# Altium PCB Fast_Servo.PCBDOC (part 10 of 11)
Units mm, origin at the board's own origin, x right, y up, seen from the top; angles counter-clockwise.
Board outline 162.48 x 100 mm, 6 copper layers (Top, GP1(GND), L3, L4, P3V3, Bot), stack 1.716 mm thick; 668 components, 491 nets, 2308 pads, 1133 vias.
Unrouted connection lines stored in the file: 2.
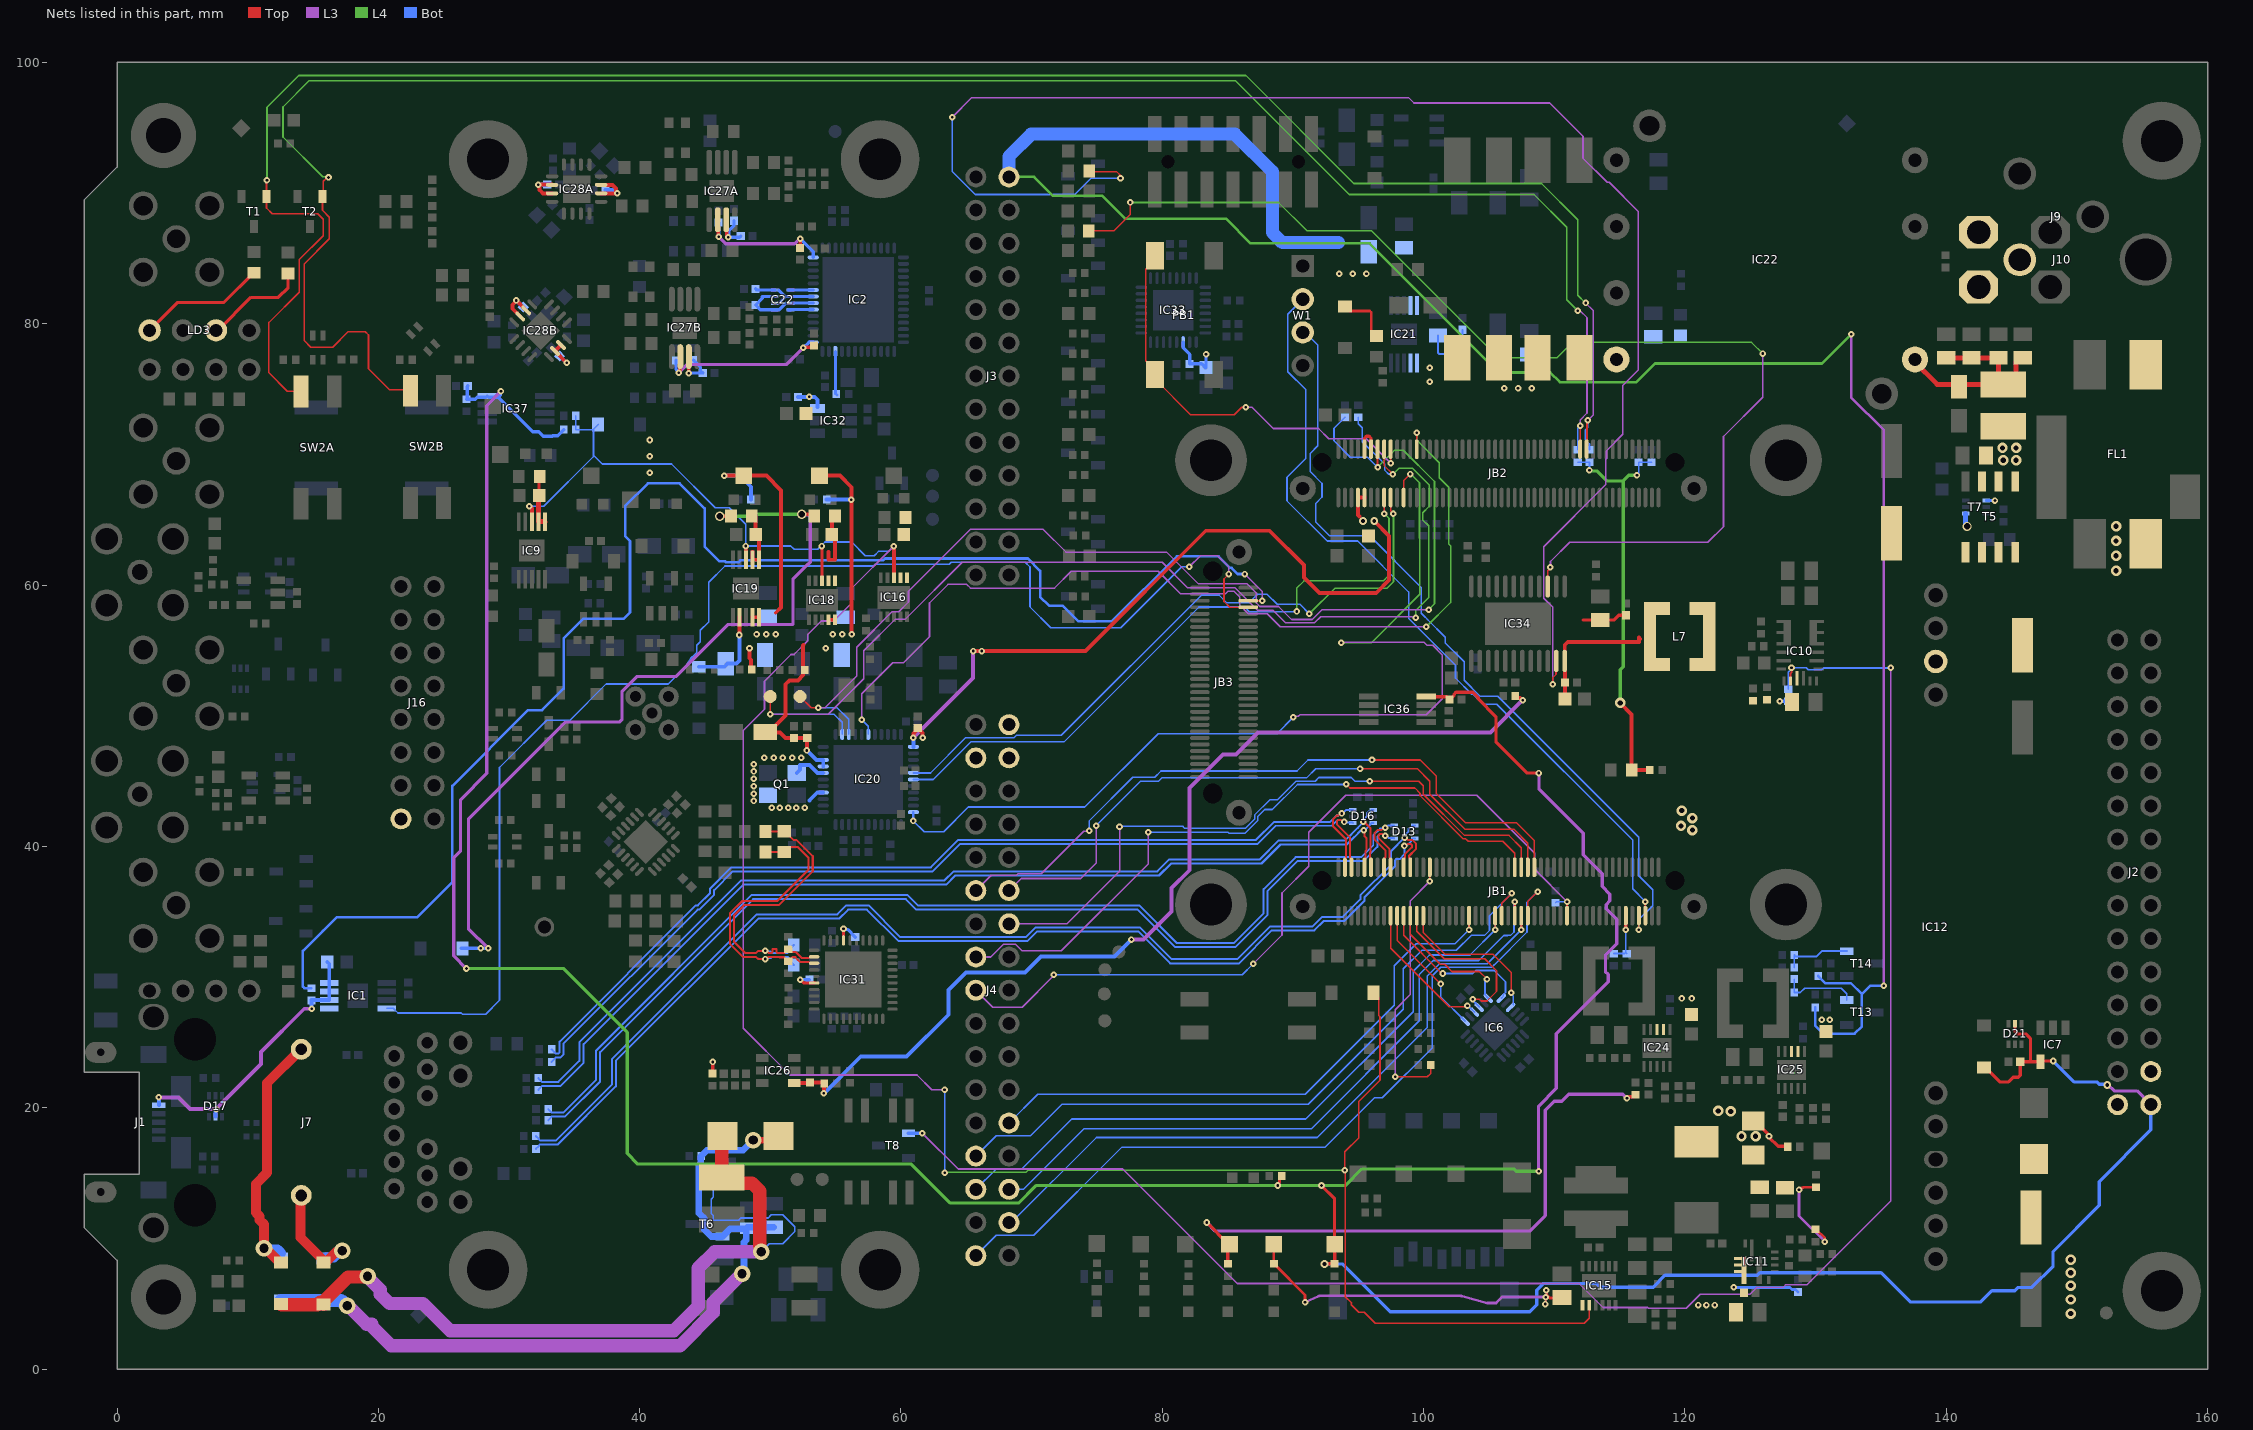
[diagram p12: the nets of this part, all layers, seen from the top]

## Via types
v1: diameter 0.5, hole 0.2, Top to Bot, tented both sides, 1045 vias
v2: diameter 0.8, hole 0.4, Top to Bot, tented both sides, 40 vias
v3: diameter 0.6, hole 0.3, Top to Bot, tented both sides, 27 vias
v4: diameter 1.27, hole 0.711, Top to Bot, tented both sides, 11 vias
v5: diameter 0.7, hole 0.5, Top to Bot, tented both sides, 10 vias

## Nets (pads, with @x,y where several pads share a name; then routed paths per layer and width w, separated by ;. In a path a pad name is that pad's centre, name@x,y a point inside that pad or via, vN(x,y) a via of type N, cw(c..) or ccw(c..) an arc to the next point about the centre after c; other vN are vias at no path point) (continued)
P3V3_LDO_1: C133.2 IC16.1 IC16.2 L21.2
P3V3_LDO_2: C197.2 IC9.1 IC9.2 L22.2 | length 4.1
  Top w0.25: C197.2@32.303,66.849 32.303,67.929 32.132,68.099 L22.2@32.353,68.32
  Top w0.381: C197.2@32.303,66.849 32.274,66.82 32.274,64.877 32.286,64.866 32.728,64.866 IC9.1@32.745,64.849
P3V3_MP: C98.2 C204.2 C205.2 D21.5 D26.1 IC7.4 IC36.8 IC37.8 J2.30 R110.1 R133.1 R226.1 R231.1 TP17.1 | length 306
  Top w0.254: v1(88.824,14.05) 88.824,14.117 88.966,14.259 88.966,14.62 R133.1@89.129,14.783 ; v1(92.184,14.05) 93.185,13.049 TP17.1@93.185,9.565 93.189,9.561 93.189,8.114 R110.1@93.15,8.075 ; v3(92.425,8.05) 92.5,8.05 92.512,8.062 R110.1@93.189,8.062 ; IC36.8@100.216,51.465 101.766,51.465 C204.2@101.991,51.24 102.329,51.578 102.329,51.655 102.477,51.802 103.306,51.802 103.315,51.793 103.754,51.793 104.176,51.371 104.176,51.305 105.537,49.944 105.537,48 107.92,45.617 v1(108.825,45.617) ; D26.1@142.9,23.1 142.98,23.1 144.101,21.979 144.765,21.979 145.127,22.342 145.516,22.342 145.665,22.49 C98.2@145.665,23.525 146.445,23.525 ; D21.5@145.265,26.441 145.265,25.801 145.415,25.651 146.099,25.651 146.445,25.305 146.445,23.525 ; v1(148.175,23.578) 146.978,23.578 146.925,23.525 146.445,23.525
  L3 w0.254: v1(26.746,30.658) 25.762,31.642 25.762,39.14 26.29,39.668 26.29,43.591 28.288,45.589 28.288,73.732 v1(29.387,74.831) ; v1(108.799,15.133) 108.799,20.127 110.16,21.487 110.16,25.672 114.122,29.634 114.122,30.201 113.919,30.404 113.919,31.674 114.781,32.535 114.781,34.416 113.975,35.221 113.975,35.554 114.25,35.829 114.25,36.357 113.668,36.939 113.668,37.927 112.225,39.369 112.225,41.015 108.825,44.415 v1(108.825,45.617) ; v3(152.32,21.732) 152.4,21.732 152.841,21.29 154.602,21.29 J2.30@155.654,20.238
  L4 w0.254: v1(26.746,30.658) 26.752,30.664 34.157,30.664 39.059,25.761 39.059,16.501 39.865,15.695 60.801,15.695 63.788,12.708 68.994,12.708 70.333,14.046 94.012,14.046 95.282,15.316 106.909,15.316 107.092,15.133 v1(108.799,15.133) ; v3@92.42,8.062 v3@92.437,8.062
  Bot w0.25: 151.7,14.35 155.654,18.304 J2.30@155.654,20.238
  Bot w0.254: C205.2@26.845,75.252 26.797,75.204 26.797,74.283 R231.1@26.75,74.236 27.415,74.236 27.555,74.376 28.237,74.376 IC37.8@28.335,74.474 28.433,74.376 29.191,74.376 ; v1(29.387,74.831) 29.34,74.784 29.34,74.524 29.191,74.376 ; R226.1@34.18,71.899 34.18,71.879 34.017,71.716 33.997,71.716 33.724,71.443 33.353,71.443 33.315,71.405 32.615,71.405 32.27,71.75 31.817,71.75 29.191,74.376 ; v3(92.425,8.05) 93.78,8.05 97.45,4.38 108.115,4.38 108.665,4.93 108.665,6.048 109.164,6.547 113.234,6.547 113.506,6.276 117.576,6.276 118.472,7.172 125.533,7.172 125.743,7.382 135.006,7.382 137.25,5.138 142.638,5.138 143.5,6 145.25,6 145.5,6.25 146.558,6.25 148.175,7.867 148.175,9 151.7,12.525 151.7,14.35 ; v1(148.175,23.578) 149.775,21.978 151.512,21.978 151.692,21.798 152.254,21.798 v3(152.32,21.732)
P3V3_POWER_OK: IC10.14 R136.2 T8.1 | length 135.4
  Top w0.125: IC10.14@128.075,52.672 128.075,53.235 128.154,53.313 128.154,53.675 v1(128.156,53.678)
  L3 w0.125: v1(61.639,18.049) 64.376,15.313 76.974,15.313 85.734,6.553 111.895,6.553 113.735,4.713 117.165,4.713 117.218,4.661 120.111,4.661 121.18,5.73 124.98,5.73 125.5,6.25 127.5,6.25 127.692,6.442 129.324,6.442 135.75,12.869 v1(135.75,53.678)
  Bot w0.125: R136.2@127.907,52.042 127.907,53.327 128.156,53.576 v1(128.156,53.678) 129.288,53.678 129.445,53.521 130.475,53.521 130.614,53.66 135.732,53.66 v1(135.75,53.678)
  Bot w0.3: T8.1@60.576,18.051 61.637,18.051 v1(61.639,18.049)
P3V3_SOM_OUT: JB2.9 JB2.11 | length 2.3
  Top w0.25: JB2.9@95.475,70.404 95.475,71.25 95.621,71.396 95.828,71.396 95.965,71.26 95.965,70.413 JB2.11@95.975,70.404
P3V3A: C7.2 C8.2 C48A.2 C48B.2 C49A.2 C49B.2 C86.2 C87.2 C142.2 C143.1 C156.2 C157.2 C162.1 IC18.9 IC18.10 IC20.8 IC20.9 IC27A.3 IC27B.3 IC31.17 IC31.26 IC33.3 R21.1 R112.1 R216.2 TP4.1 | length 47.5
  Top w0.25: IC18.9@54.457,57.343 IC18.10@54.957,57.343
  Top w0.254: v1(43.744,76.22) 43.753,76.229 43.753,77.478 IC27B.3@43.763,77.487 ; R21.1@45.592,22.637 v1@45.592,23.492 ; IC27A.3@46.624,87.962 46.662,87.924 46.662,86.747 v1(46.783,86.625) ; v1(52.303,29.805) 52.553,29.555 IC31.26@53.351,29.555 IC31.26@53.349,29.557 ; IC31.17@55.601,32.805 v1(55.601,33.695)
  Top w0.3: C162.1@49.611,48.754 49.887,48.754 51.166,50.034 51.166,52.413 51.464,52.711 52.118,52.711 52.515,53.108 52.515,55.399 52.553,55.437 ; C162.1@49.887,48.715 50.74,48.715 51.166,48.289 C156.2@51.8,48.289 ; C156.2@51.8,48.3 C157.2@52.825,48.3 52.814,48.289 52.814,47.357 v1(52.803,47.346) ; TP4.1@53.761,68.38 55.32,68.38 56.207,67.494 v1(56.207,66.539) 56.207,56.281 v1(56.244,56.244)
  Bot w0.25: C48B.2@44.125,77.215 44.125,77.195 44.269,77.051 44.289,77.051 44.658,76.682 44.658,76.42 C49B.2@44.83,76.247 ; C49A.2@47.214,87.891 47.214,87.5 46.831,87.117 46.831,86.673 v1(46.783,86.625) 47.645,86.625 C48A.2@47.737,86.717
  Bot w0.254: v1(43.744,76.22) 43.758,76.233 44.817,76.233 C49B.2@44.83,76.247 ; v1(52.303,29.805) C8.2@53.001,29.805 ; v1(55.601,33.695) 55.649,33.648 55.912,33.648 C7.2@56.5,33.06 ; IC33.3@81.596,78.593 81.598,78.591 81.598,78.155 82.096,77.657 C87.2@82.096,76.934 83.006,76.934 C86.2@83.296,76.644 ; C86.2@83.348,76.644 v1(83.348,77.669)
  Bot w0.3: v1(52.803,47.346) 53.523,46.625 IC20.9@54.05,46.625 IC20.8@54.05,46.125 ; R112.1@54.304,66.539 v1(56.207,66.539)
  other v1: 45.605,23.505 54.232,55.183 54.77,56.244 55.507,56.244
P5V0A: C32.2 C33.2 C38A.2 C38B.2 C52A.2 C52B.2 C146.2 C147.1 IC19.9 IC19.10 IC28A.6 IC28A.7 IC28A.14 IC28A.15 IC28B.6 IC28B.7 IC28B.14 IC28B.15 IC32.3 R108.1 R214.2 TP2.1 | length 35.7
  Top w0.3: IC28B.7@30.864,80.566 30.28,81.149 30.28,81.456 30.555,81.731 v1(30.555,81.785) 30.564,81.785 IC28B.6@31.323,81.025 ; v1(32.225,90.65) 33.289,90.65 IC28A.6@33.302,90.637 IC28A.6@33.096,90.637 ; v1@32.334,90.526 32.334,90.246 32.436,90.144 32.593,89.987 IC28A.7@33.302,89.987 ; IC28B.15@33.975,78.374 IC28B.14@33.515,77.914 v1(34.419,77.01) ; IC28A.14@37.052,89.987 v1(38.287,89.987) ; IC28A.15@37.052,90.637 37.912,90.637 38.202,90.348 v1@38.202,90.094 ; v1(46.465,68.379) TP2.1@47.978,68.38 ; TP2.1@47.978,68.38 49.702,68.38 50.833,67.25 50.833,58.301 50.418,57.886 ; v1(48.407,55.183) 48.407,54.41 48.529,54.287 48.529,53.586 R214.2@48.587,53.527 ; IC19.9@48.632,57.542 IC19.10@49.132,57.542
  Bot w0.3: v1(30.555,81.785) 30.581,81.785 30.645,81.721 31.085,81.282 31.147,81.22 C38B.2@31.164,81.22 ; v1(32.225,90.65) 33.04,90.65 C38A.2@33.052,90.662 ; C52B.2@33.815,77.686 33.815,77.614 v1(34.419,77.01) ; C52A.2@37.371,90.225 37.995,90.225 38.233,89.987 v1(38.287,89.987) ; v1(46.465,68.379) 47.657,68.379 48.508,67.529 R108.1@48.508,66.539 ; C33.2@52.118,74.402 53.403,74.402 53.617,74.188 IC32.3@53.617,73.643
  other v1: 48.945,56.244 49.681,56.244 50.418,56.244 40.774,68.594 40.774,69.85 40.774,71.106 52.975,74.429
P5V5: C105.2 C111.2 C187.2 D30.2 IC10.15 IC24.2 IC24.3 IC25.2 IC25.3 L7.1 L17.1 L20.1 R114.1 R128.2 R129.2 R136.1 R139.2 R200.1 R205.1 TP10.1 | length 113.6
  Top w0.254: v5(46.133,65.274) 46.986,65.274 L17.1@46.987,65.276 ; v5(52.41,65.421) 53.21,65.421 L20.1@53.355,65.276 ; v1(83.4,11.22) 85.055,9.565 TP10.1@85.142,9.565 85.02,9.443 R114.1@85.02,8.062 ; v1(115.561,20.722) 115.672,20.832 116.055,20.832 R200.1@116.218,20.995 ; R139.2@124.921,19.311 R139.2@125.232,19 125.357,19 126.385,17.972 126.385,17.865 v1(126.432,17.818) 126.432,17.756 127.141,17.047 127.824,17.047 R205.1@127.857,17.015
  L3 w0.254: v1(28.4,32.2) 26.898,33.702 26.898,42.099 34.319,49.52 38.445,49.52 38.654,49.729 38.654,51.894 39.76,53 42.776,53 46.764,56.988 51.739,56.988 51.739,60.485 52.861,61.608 52.901,61.608 53.05,61.757 53.05,65.237 52.901,65.386 52.445,65.386 v5(52.41,65.421) ; v1(83.4,11.22) 84.054,10.566 108.114,10.566 109.301,11.754 109.301,19.801 110,20.5 110.57,20.5 111.106,21.036 115.246,21.036 v1(115.561,20.722)
  L4 w0.254: v5(46.133,65.274) 48.394,65.274 48.541,65.421 v5(52.41,65.421)
  Bot w0.254: D30.2@26.338,32.2 v1(28.4,32.2) ; v1(127.25,51.122) 127.27,51.102 R136.1@127.907,51.102
  other v1: 130.475,26.728 131.095,26.728 119.75,28.367 120.518,28.367 27.83,32.2
  other v2: 124.327,17.818 125.407,17.818 123.5,19.725 122.547,19.761 120.575,41.253 119.7,41.575 120.575,42.175 119.75,42.741
P5V5_LDO3: C141.2 IC18.1 IC18.2 L20.2 | length 5
  Top w0.3: 54.462,62.522 54.457,62.517 54.457,61.942 54.957,61.942 54.957,63.638 C141.2@54.707,63.888 ; C141.2@54.462,63.643 C141.2@54.707,63.888 ; L20.2@54.955,65.276 54.707,65.027 C141.2@54.707,63.888
P5V5_LDO5: C145.2 IC19.1 IC19.2 L17.2 | length 5
  Top w0.3: IC19.2@48.637,62.522 48.632,62.517 IC19.2@48.632,61.942 IC19.1@49.132,61.942 49.132,63.638 C145.2@48.881,63.888 ; C145.2@48.637,63.643 C145.2@48.881,63.888 ; L17.2@48.687,65.367 L17.2@48.687,65.421 ; L17.2@48.881,65.367 C145.2@48.881,63.888
P5V5A: C91.2 C92.2 C120.2 C121.2 IC34.24 L7.2 | length 13.8
  Top w0.254: 112.225,57.329 C120.2@113.525,57.329 114.564,57.329 114.933,57.698 C121.2@115.475,57.698
  Top w0.3: C91.2@110.813,51.275 110.806,51.281 110.806,54.198 IC34.24@110.8,54.205 110.8,55.43 111.031,55.661 116.475,55.661 116.475,55.987 116.575,55.887 116.575,55.86
P5V5SW: C118.2 C119.2 L6.2 R139.1 R140.2 R207.2 | length 7.4
  Top w0.203: v1(128.732,13.72) 128.812,13.72 128.962,13.87 129.034,13.87 129.089,13.925 R140.2@130.027,13.925 ; R207.2@130.007,10.695 130.027,10.695 130.707,10.015 v1(130.707,9.755)
  L3 w0.203: v1(128.732,13.72) 128.732,11.73 v1(130.707,9.755)
P12V0: C81.1 C104.2 C116.2 C117.2 C176.2 D23.1 FL1.2 IC11.8 IC15.1 J2.28 J2.29 J4.31 J4.32 J4.33 L12.1 R107.2 R138.2 T5.1 T5.2 T5.3 T7.1 TP1.1 | length 32.7
  Top w0.125: v1(109.322,4.978) 109.334,4.991 109.334,5.499 v1(109.347,5.512)
  Top w0.203: TP1.1@88.529,9.565 88.529,8.064 90.925,5.668 v1(90.925,5.102) ; v1(109.372,6.045) 109.429,5.988 109.429,5.66 109.654,5.436 110.461,5.436 C104.2@110.6,5.297 ; C104.2@110.38,5.077 C104.2@110.6,5.297 ; C104.2@110.6,5.47 C104.2@110.6,5.297
  L3 w0.203: v1(90.925,5.102) 91.953,5.564 ; 91.954,5.564 ccw(c91.87,5.749) 92.012,5.604 ; 92.013,5.605 102.832,5.605 cw(c102.832,5.402) 102.904,5.592 102.957,5.572 cw(c102.905,5.376) 102.959,5.572 104.875,5.055 105.548,5.055 106.005,5.512 v1(109.347,5.512)
  Bot w0.203: v1(123.75,6.25) 128.033,6.25 128.195,6.088 128.467,6.088 R138.2@128.655,5.9 ; T7.1@143.065,66.475 v1(143.727,66.475)
  other v1: 121.018,4.901 121.647,4.901 122.267,4.901
  other v2: 149.526,4.247 149.526,5.327 149.526,6.387 149.526,7.372 149.526,8.372 153,61.096 153,62.25 153,63.38 153,64.5 144.367,69.554 145.34,69.554 144.305,70.5 145.34,70.5
P12V0A: C164.2 C165.1 D28.1 IC21.9 IC21.10 J3.25 J16.15 R123.2 R124.2 R224.2 | length 175
  Top w0.2: D28.1@93.978,81.339 94.338,80.979 95.876,80.979 95.993,80.861 95.993,79.426 96.343,79.076 R224.2@96.393,79.076
  L3 w0.2: v1(132.715,79.197) 132.715,74.371 135.23,71.857 v1(135.23,29.337)
  L4 w0.2: J3.25@68.27,91.24 70.177,91.24 71.603,89.814 75.376,89.814 77.146,88.044 84.881,88.044 86.766,86.16 95.856,86.16 105.74,76.276 109.68,76.276 110.426,75.53 116.285,75.53 117.718,76.962 130.48,76.962 v1(132.715,79.197)
  Bot w0.2: R123.2@129.964,27.689 129.964,26.287 130.582,25.668 132.983,25.668 133.535,26.22 133.535,28.695 ; R124.2@130.215,30.081 130.215,30.061 130.736,29.54 132.69,29.54 133.535,28.695 ; v1(135.23,29.337) 134.177,29.337 133.535,28.695
  Bot w1: J3.25@68.27,91.24 68.27,92.82 69.969,94.519 85.558,94.519 88.432,91.645 88.432,86.975 89.193,86.214 93.475,86.214
  other v1: 93.536,83.845 94.581,83.845 95.626,83.845
P12V0F: FL1.1 J9.3 J10.3 J10.4
P12V0FIL: C171.1 C172.2 C173.2 C174.2 C175.2 IC22.1 L12.2 | length 16.7
  Top w0.381: IC22.1@137.61,77.276 137.61,77.052 139.3,75.362 L12.2@144.367,75.362 ; C172.2@140,77.4 C174.2@141.935,77.4 C175.2@144,77.4 144,75.729 L12.2@144.367,75.362 ; C173.2@145.85,77.4 145.675,77.4 145.34,77.065 145.34,76.172 144.531,75.362 L12.2@144.367,75.362
P12V0POE: C124.1 C125.1 IC12.8 T5.5 T5.6 T5.7 T5.8 T7.4 | length 1
  Bot w0.381: T7.4@141.485,65.475 141.485,64.697 141.596,64.586 v5(141.596,64.5)
P13V0: C163.2 C170.2 IC21.1 IC21.2 L11.2 | length 4.7
  Bot w0.152: C163.2@101.1,79.1 101.1,77.782 101.202,77.68 102.221,77.68 102.975,78.434 C170.2@102.975,79.544
  other v1: 100.475,75.579 100.475,76.624
P13V0FIL: C168.2 C169.1 L10.2 L11.1
  other v1: 106.18,75.068 107.225,75.068 108.27,75.068
P13V0S: C167.2 IC22.7 L10.1 R176.2
PGOOD: JB1.29 R158.2 | length 20.6
  Top w0.125: v1(97.825,22.375) 100.286,22.375 100.535,22.624 R158.2@100.535,23.276 ; v1(100.475,37.329) JB1.29@100.475,38.404
  L3 w0.125: v1(97.825,22.375) 97.825,27.513 98.975,28.663 98.975,35.829 v1(100.475,37.329)
PHY_MDI0_N: D16.4 JB1.5 R95.1 | length 74.5
  Top w0.152: v1(93.925,41.873) 93.831,41.873 93.663,42.041 93.464,42.041 93.375,41.952 93.375,41.668 94.381,40.662 94.381,39.138 94.475,39.044 JB1.5@94.475,38.404
  Bot w0.152: R95.1@33.265,23.505 33.479,23.719 33.479,23.745 33.568,23.834 33.912,23.834 34.184,24.106 34.184,24.925 44.43,35.171 44.568,35.171 45.696,36.299 45.696,36.649 47.142,38.095 62.424,38.095 64.526,40.196 86.366,40.196 86.371,40.201 87.296,40.201 88.678,41.584 92.976,41.584 93.344,41.952 93.358,41.952 93.447,42.041 93.663,42.041 93.831,41.873 v1(93.925,41.873) 93.963,41.835 94.542,41.835 D16.4@94.58,41.797
PHY_MDI0_P: D16.6 JB1.3 R94.1 | length 74.9
  Top w0.152: v1(93.745,42.524) 93.654,42.524 93.482,42.353 93.335,42.353 93.063,42.081 93.063,41.538 94.069,40.533 94.069,39.138 93.975,39.044 JB1.3@93.975,38.404
  Bot w0.152: R94.1@33.265,24.475 33.479,24.261 33.479,24.235 33.568,24.146 33.783,24.146 33.872,24.235 33.872,25.055 44.301,35.483 44.453,35.483 45.384,36.414 45.384,36.778 47.012,38.407 62.295,38.407 64.396,40.508 86.366,40.508 86.371,40.503 87.171,40.503 88.553,41.886 92.85,41.886 93.318,42.353 93.482,42.353 93.654,42.524 v1(93.745,42.524) 93.794,42.524 94.067,42.797 D16.6@94.58,42.797
PHY_MDI1_N: D16.1 JB1.11 R195.1 | length 77.6
  Top w0.16: v1(95.37,41.884) 95.436,41.884 95.944,41.377 95.944,39.575 95.885,39.516 95.885,39.132 95.975,39.042 JB1.11@95.975,38.404
  Bot w0.16: R195.1@32.245,22.275 32.245,22.255 32.519,21.981 33.783,21.981 35.388,23.587 35.388,25.002 47.786,37.4 63.333,37.4 64.028,38.095 79.617,38.095 80.532,39.009 85.879,39.009 85.884,39.004 87.464,39.004 88.922,40.462 94.001,40.462 94.494,40.955 94.494,40.962 94.964,41.432 94.964,41.443 95.37,41.849 v1(95.37,41.884) 95.37,41.976 95.495,42.101 95.495,42.132 95.67,42.307 95.67,42.532 95.79,42.652 95.88,42.652 96.025,42.797 D16.1@96.16,42.797
PHY_MDI1_P: D16.3 JB1.9 R194.1 | length 76.2
  Top w0.16: v1(95.421,41.253) 95.486,41.188 95.486,40.776 95.624,40.638 95.624,39.707 95.565,39.649 95.565,39.132 95.475,39.042 JB1.9@95.475,38.404
  Bot w0.16: R194.1@32.245,21.367 32.245,21.387 32.519,21.661 33.916,21.661 35.708,23.454 35.708,24.87 47.918,37.08 63.466,37.08 64.161,37.775 79.75,37.775 80.664,38.689 85.879,38.689 85.884,38.694 87.592,38.694 89.05,40.152 94.13,40.152 94.714,40.736 94.721,40.736 95.173,41.188 95.356,41.188 v1(95.421,41.253) 95.481,41.253 96.025,41.797 D16.3@96.16,41.797
PHY_MDI2_N: D13.1 JB1.17 R197.1 | length 83
  Top w0.152: v1(97.07,40.808) 96.976,40.808 96.832,40.952 96.628,40.952 96.539,40.863 96.539,40.664 97.381,39.822 97.381,39.138 97.475,39.044 JB1.17@97.475,38.404
  Bot w0.152: R197.1@33.005,19.042 33.005,19.062 33.259,19.315 34.282,19.315 36.975,22.009 36.975,24.255 48.685,35.965 60.378,35.965 61.172,35.171 78.116,35.171 80.997,32.291 85.588,32.291 88.06,34.763 88.06,36.599 90.336,38.875 95.37,38.875 96.457,39.962 96.457,40.734 96.681,40.958 96.826,40.958 ; v1(97.07,40.808) 97.164,40.808 97.316,40.656 97.698,40.656 D13.1@97.742,40.612
PHY_MDI2_P: D13.3 JB1.15 R196.1 | length 83.8
  Top w0.152: JB1.15@96.975,38.404 96.975,39.044 97.069,39.138 97.069,39.692 96.227,40.535 96.227,40.992 96.499,41.264 96.787,41.264 96.959,41.435 v1(97.05,41.435)
  Bot w0.152: R196.1@33.005,19.901 33.005,19.881 33.258,19.627 34.152,19.627 36.663,22.138 36.663,24.384 48.556,36.277 60.507,36.277 61.301,35.483 78.245,35.483 81.126,32.603 85.459,32.603 87.748,34.892 87.748,36.728 90.207,39.187 95.241,39.187 96.145,40.091 96.145,40.849 96.665,41.369 96.984,41.369 v1(97.05,41.435) 97.123,41.435 97.3,41.612 D13.3@97.742,41.612
PHY_MDI3_N: D13.4 JB1.23 R199.1 | length 86.5
  Top w0.152: v1(98.539,40.672) 98.633,40.672 98.799,40.506 99.14,40.506 99.411,40.234 99.411,39.798 98.881,39.267 98.881,39.138 98.975,39.044 JB1.23@98.975,38.404
  Bot w0.152: R199.1@32.06,17.839 32.274,17.625 32.274,17.591 32.363,17.502 32.927,17.502 32.929,17.501 33.608,17.501 37.871,21.763 37.871,23.716 48.949,34.794 55.129,34.794 55.819,35.483 57.519,35.483 59.923,33.079 69.577,33.079 70.303,33.805 78.283,33.805 80.716,31.371 85.75,31.371 88.261,33.883 91.502,33.883 92.225,34.606 93.812,34.606 95.162,35.956 95.162,36.254 97.507,38.599 97.507,39.653 v1@98.532,40.679 ; v1@98.606,40.896 98.836,41.126 98.836,41.345 98.954,41.463 99.038,41.463 99.187,41.612 D13.4@99.322,41.612
PHY_MDI3_P: D13.6 JB1.21 R198.1 | length 85.5
  Top w0.152: JB1.21@98.475,38.404 98.475,39.044 98.569,39.138 98.569,39.396 99.099,39.927 99.099,40.105 99.01,40.194 98.782,40.194 98.627,40.038 v1(98.532,40.038)
  Bot w0.152: R198.1@32.065,16.85 32.279,17.064 32.279,17.101 32.368,17.19 32.798,17.19 32.799,17.189 33.737,17.189 38.183,21.634 38.183,23.587 49.078,34.482 55.259,34.482 55.948,35.171 57.389,35.171 59.794,32.767 69.692,32.767 70.428,33.503 78.158,33.503 80.601,31.059 85.879,31.059 88.391,33.571 91.631,33.571 92.354,34.294 93.941,34.294 95.474,35.827 95.474,36.125 97.07,37.721 97.07,37.735 97.809,38.474 97.809,38.939 97.898,39.028 98.162,39.028 98.532,39.399 v1(98.532,40.038) ; v1@98.761,40.105 99.032,40.376 99.032,40.457 99.187,40.612 D13.6@99.322,40.612
POE_IN1: D14.2 D19.1 J7.13 | length 9.2
  Top w0.762: J7.13@14.036,13.537 14.036,10.083 15.838,8.28 16.082,8.28 16.755,8.953 17.152,8.953 v4(17.249,9.05)
  Bot w0.762: D19.1@15.967,8.513 15.983,8.529 16.591,8.529 17.112,9.05 v4(17.249,9.05)
POE_IN2: D15.2 D20.1 J7.14 | length 19.7
  Top w0.762: D15.2@12.258,8.355 11.363,9.25 v4(11.25,9.25) 11.243,9.257 11.243,11.084 10.906,11.421 10.906,11.696 10.632,11.97 10.632,14.172 11.488,15.028 11.488,21.893 J7.14@14.02,24.425
  Bot w0.762: v4(11.25,9.25) 11.347,9.153 12.297,9.153 D20.1@12.55,8.9
POE_VC+: D14.1 D15.1 D18.1 L8.1 R144.2 | length 68
  Top w1.016: D15.1@12.582,4.927 12.947,4.927 12.949,4.925 15.33,4.925 D14.1@15.543,5.138 ; D14.1@15.812,4.95 15.844,4.982 15.844,5.214 17.681,7.051 19.126,7.051 v4(19.175,7.1) ; D18.1@46.338,17.845 46.279,17.786 L8.1@46.279,14.656 46.703,14.231 48.604,14.231 49.199,13.636 v4@49.199,9.481
  L3 w1.016: v4(19.175,7.1) 19.175,7.031 20.141,6.065 20.141,5.731 20.86,5.013 23.42,5.013 25.496,2.937 42.619,2.937 44.495,4.812 44.495,7.737 45.735,8.977 v4(49.299,8.977)
  Bot w0.127: R144.2@45.631,14.503 45.631,13.165 45.471,13.005 45.471,11.902 45.621,11.752 45.621,11.472 45.696,11.398 47.58,11.398 47.749,11.567 49.835,11.567 50.079,11.811 50.952,11.811 51.873,10.891 51.873,10.524 50.95,9.601 49.923,9.601 v4(49.299,8.977)
POE_VC-: C126.1 D18.2 D19.2 D20.2 R148.1 R149.1 R150.1 T6.2 | length 61
  Top w0.508: v4@48.675,17.526 v4(48.692,17.526) D18.2@50.319,17.526
  L3 w1.016: v4(17.614,4.85) 17.683,4.85 19.102,3.431 19.519,3.431 19.519,3.256 20.979,1.796 43.092,1.796 45.636,4.34 45.636,5.125 47.744,7.234 v4@47.834,7.234
  Bot w0.508: v4(47.84,7.305) 47.985,7.45 47.985,7.981 47.988,7.983 47.988,9.707 48.149,9.868 R150.1@48.149,10.748 ; v4(48.692,17.526) 47.912,16.746 45.146,16.746 44.72,16.32 R149.1@44.72,16.3 44.684,16.264 44.684,15.749 44.526,15.592 44.526,11.938 44.69,11.774 44.719,11.774 44.943,11.551 44.943,10.684 45.484,10.143 T6.2@46.337,10.143 46.941,10.748 R150.1@48.149,10.748 ; C126.1@50.254,10.852 48.253,10.852 R150.1@48.184,10.782 R150.1@48.149,10.748
  Bot w1.016: D20.2@12.55,5.25 17.145,5.25 17.545,4.85 v4(17.614,4.85)
PROGSEL: JB1.90 R185.1 R186.2 | length 3.9
  Top w0.25: v1(115.475,33.629) JB1.90@115.475,34.704
  Bot w0.125: R186.2@114.55,31.802 115.4,31.802 R185.1@115.475,31.877 ; v1(115.475,33.629) R185.1@115.475,31.877 ; R185.1@115.55,31.802 R185.1@115.475,31.877
PWR_BANK13: C132.1 C161.2 IC20.23 JB2.8 JB2.10 R53A.1 R53B.1 R100.1 R102.1 R209.1 R210.2 | length 88.2
  Top w0.3: v1(60.95,48.325) 60.95,48.633 C161.2@61.331,49.014 ; C161.2@61.285,49.06 C161.2@61.331,49.014 ; C161.2@61.342,49.025 C161.2@61.331,49.014 ; v1(61.653,48.325) 61.65,48.328 61.65,48.695 C161.2@61.331,49.014 ; v1(65.525,54.955) v1(66.185,54.955) 74.124,54.955 83.328,64.159 88.216,64.159 90.842,61.534 90.842,60.598 92.029,59.411 96.373,59.411 97.347,60.385 97.347,63.775 v3(96.223,64.9) ; 95.081,65.255 94.975,65.361 JB2.8@94.975,66.704 JB2.10@95.475,66.704 ; v2(115.05,50.981) 115.925,50.106 R209.1@115.925,45.856 R210.2@117.317,45.856
  L3 w0.3: v1(60.95,48.325) 65.525,52.9 v1(65.525,54.955)
  L4 w0.25: v1(112.693,68.788) 112.741,68.74 113.26,68.74 114.024,67.975 115.272,67.975 ; v2(115.05,50.981) 115.05,53.521 115.272,53.743 115.272,67.975 ; v1(116.329,68.404) 115.701,68.404 115.272,67.975
  Bot w0.125: R102.1@111.8,69.415 R100.1@112.693,69.415 v1(112.693,68.788) ; v1(116.329,68.404) 116.455,68.53 R53B.1@116.455,69.415 R53A.1@117.451,69.415
  Bot w0.3: IC20.23@60.95,47.625 v1(60.95,48.325)
  other v3: 95.35,64.904
PWR_EN: D31.1 D32.1 IC9.3 IC15.2 IC16.3 IC18.3 IC19.3 R226.2 R228.2 | length 188.9
  Top w0.125: D31.1@96.16,28.802 96.557,28.404 96.557,27.068 96.665,26.96 96.665,22.108 95.033,20.475 95.033,17.69 93.965,16.623 v1(93.965,15.208) 94.008,15.165 94.008,5.542 94.495,5.055 94.461,5.021 94.461,4.917 95.033,4.346 95.467,4.346 96.293,3.52 112.294,3.52 112.675,3.901 IC15.2@112.675,4.87
  Top w0.16: v1(53.937,62.992) v1@53.947,62.982 ; IC18.3@53.947,60.353 IC18.3@53.957,60.343
  Top w0.25: IC18.3@53.947,60.353 v1@53.947,62.982
  Top w0.3: v1(31.553,66.041) 31.745,65.848 IC9.3@31.745,64.849 ; v1(48.112,62.992) 48.132,62.972 IC19.3@48.131,61.942 ; v1(59.438,62.973) 59.458,62.953 IC16.3@59.458,60.564
  L3 w0.125: v1(59.438,62.973) 56.175,59.709 56.175,58.565 54.862,57.252 53.891,57.252 52.861,56.222 52.861,55.74 51.808,54.686 51.587,54.686 49.55,52.649 49.55,50.491 47.93,48.871 47.93,26.086 51.511,22.504 61.227,22.504 62.351,21.38 v1(63.333,21.38)
  L4 w0.125: v1(63.348,15.037) 63.373,15.062 69.571,15.062 69.716,15.208 v1(93.965,15.208)
  Bot w0.125: R228.2@35.12,72.966 R226.2@35.12,71.899 36.434,71.899 D32.1@36.471,71.936 ; v1(63.333,21.38) 63.34,21.373 63.34,15.044 v1(63.348,15.037)
  Bot w0.127: v1(31.553,66.041) 32.662,66.041 36.471,69.849 36.471,69.931 ; D32.1@36.825,72.29 36.471,71.936 36.471,69.931 ; v1(59.438,62.973) 59.046,62.58 58.282,62.58 57.961,62.259 57.263,62.259 56.222,63.3 54.188,63.3 53.622,62.734 51.834,62.734 51.576,62.992 v1(48.112,62.992) 48.112,64.662 46.853,65.921 45.784,65.921 42.433,69.272 37.13,69.272 36.471,69.931
QOUT_N: C54.2 IC31.22 R12.1 R14.2 R61.1 | length 24.9
  Top w0.16: R61.1@49.635,41.143 51.034,41.143 C54.2@51.066,41.175 51.091,41.175 51.759,40.507 51.993,40.507 53.246,39.255 53.246,38.094 50.66,35.508 47.985,35.508 47.221,34.744 47.221,32.692 48.06,31.853 48.914,31.853 49.071,32.01 49.703,32.01 49.857,31.856 50.001,31.856 50.113,31.856 ccw(c50.113,31.904) 50.161,31.904 50.161,32.108 cw(c50.209,32.108) 50.209,32.156 50.433,32.156 cw(c50.433,32.108) 50.481,32.108 50.481,31.904 ccw(c50.529,31.904) 50.529,31.856 50.706,31.856 50.81,31.856 50.826,31.84 51.061,31.84 51.356,32.135 R12.1@51.376,32.135 ; R12.1@51.59,31.921 51.952,31.921 52.407,31.466 52.407,31.457 52.952,31.457 53.05,31.555 IC31.22@53.351,31.555
  Bot w0.16: v1(49.611,32.01) 49.677,31.945 50.017,31.945 50.105,31.856 51.331,31.856 51.424,31.95 51.424,32.083 R14.2@51.794,32.453
QOUT_P: C54.1 IC31.23 R11.1 R13.2 R65.1 | length 24.7
  Top w0.16: R65.1@49.635,39.587 51.054,39.587 C54.1@51.066,39.575 51.461,39.97 52.078,39.97 52.926,39.122 52.926,38.227 50.527,35.828 47.852,35.828 46.901,34.877 46.901,32.56 47.928,31.533 48.914,31.533 49.065,31.383 v1(49.611,31.383) 49.703,31.383 49.857,31.536 50.677,31.536 50.694,31.52 51.061,31.52 51.356,31.225 R11.1@51.376,31.225 ; R11.1@51.396,31.225 51.62,31.449 51.699,31.528 51.914,31.528 52.103,31.34 52.103,31.331 52.281,31.153 52.952,31.153 53.05,31.055 IC31.23@53.351,31.055 ; R11.1@51.416,31.225 R11.1@51.63,31.439
  Bot w0.16: v1(49.611,31.383) 49.677,31.448 50.017,31.448 50.105,31.536 51.331,31.536 51.424,31.443 51.424,31.31 R13.2@51.794,30.94
QSPI_CLK: J4.8 JB1.52 | length 53.8
  Top w0.125: JB1.52@105.975,34.704 105.987,34.716 105.987,35.641 v1(106.75,36.404)
  Bot w0.125: J4.8@65.73,16.3 67.283,17.853 69.92,17.853 72.328,20.261 91.175,20.261 98.45,27.536 98.45,30.629 99.878,32.057 102.504,32.057 103.638,33.191 104.656,33.191 105.039,33.574 105.039,34.692 v1(106.75,36.404)
QSPI_IO0: J4.6 JB1.50 | length 50.9
  Top w0.125: JB1.50@105.475,34.704 v1(105.476,33.622) v1(105.476,33.622)
  Bot w0.125: J4.6@65.73,13.76 67.283,15.313 69.253,15.313 73.076,19.136 90.981,19.136 99.2,27.354 99.2,30.438 100.454,31.692 103.547,31.692 v1(105.476,33.622)
QSPI_IO1: J4.5 JB1.56 | length 52.3
  Top w0.16: JB1.56@106.975,34.704 v1(106.975,35.779)
  Bot w0.125: J4.5@68.27,13.76 69.372,13.76 74.012,18.4 91.416,18.4 99.665,26.649 99.665,30.202 100.731,31.267 104.218,31.267 106.135,33.184 106.429,33.184 106.436,33.191 106.656,33.191 106.912,33.448 106.912,35.716 v1(106.975,35.779)
QSPI_IO2: J4.3 JB1.58 | length 51.9
  Top w0.16: v1(107.475,33.629) JB1.58@107.475,34.704
  Bot w0.125: J4.3@68.27,11.22 68.45,11.22 74.958,17.728 91.864,17.728 100.285,26.149 100.285,30.082 101.22,31.017 104.863,31.017 v1(107.475,33.629)
QSPI_IO3: J4.2 JB1.60 | length 61.3
  Top w0.125: JB1.60@107.975,34.704 107.975,35.793 v1(108.726,36.544)
  Bot w0.125: J4.2@65.73,8.68 67.283,10.233 70.16,10.233 76.919,16.991 92.473,16.991 95.269,19.788 96.239,20.757 96.826,20.757 100.65,24.581 100.65,30.094 101.313,30.757 105.204,30.757 105.379,30.932 105.397,30.932 107.912,33.448 107.912,35.731 v1(108.726,36.544)
QSPI_NCS: J4.9 JB1.42 | length 44.2
  Top w0.16: v1(103.475,33.629) JB1.42@103.475,34.704
  Bot w0.125: J4.9@68.27,18.84 70.459,21.029 90.938,21.029 97.75,27.841 97.75,30.86 99.446,32.555 102.401,32.555 v1(103.475,33.629)
REF_P1V0: C11.2 IC26.4 R19.1 R22.2 | length 75.8
  Top w0.3: IC26.4@51.861,21.872 IC26.4@51.832,21.901 52.997,21.901 C11.2@53.026,21.93 54.176,21.93 R19.1@54.251,22.005 ; C11.2@52.989,21.872 C11.2@53.017,21.843 ; v1(54.101,21.102) 54.116,21.117 54.116,21.857 R19.1@54.131,21.872 ; R22.2@107.025,51.522 107.025,51.502 107.165,51.362 107.363,51.362 107.527,51.199 v1(107.581,51.199)
  L3 w0.3: v1(77.64,32.874) 78.562,32.874 80.7,35.013 80.7,36.807 82.069,38.176 82.069,44.463 84.651,47.046 85.628,47.046 87.313,48.731 105.113,48.731 v1(107.581,51.199)
  Bot w0.3: v1(54.101,21.102) 56.92,23.92 60.43,23.92 63.627,27.117 63.627,29.014 64.967,30.355 69.49,30.355 70.707,31.572 76.338,31.572 v1(77.64,32.874)
REFH: C22.2 C22.6 C22.8 C24.1 IC2.8 | length 5.8
  Bot w0.25: C24.1@48.875,82.679 48.971,82.582 C22.8@50.378,82.582 ; C22.6@50.59,81.584 50.658,81.584 51.156,82.082 51.399,82.082 C22.2@51.578,82.082 ; C22.8@50.621,82.584 50.654,82.584 51.154,82.084 ; C22.2@51.355,82.082 C22.2@51.534,82.082 ; C22.2@51.355,82.088 51.534,82.088 IC2.8@53.284,82.088 ; C22.2@51.399,82.088 C22.2@51.578,82.088
REFH_: C22.4 IC2.6 | length 2.5
  Bot w0.25: C22.4@51.355,81.088 51.534,81.088 IC2.6@53.284,81.088 ; C22.4@51.359,81.082 C22.4@51.534,81.082 ; C22.4@51.399,81.088 C22.4@51.578,81.088 ; C22.4@51.403,81.082 C22.4@51.578,81.082
REFL: C22.3 C22.5 C22.7 C23.1 IC2.7 | length 6.7
  Bot w0.25: C22.7@50.378,82.082 49.376,82.082 49.376,81.94 C23.1@48.875,81.438 49.231,81.082 50.378,81.082 50.687,81.082 51.189,81.584 51.557,81.584 C22.3@51.578,81.585 ; C22.3@51.513,81.585 51.534,81.585 IC2.7@53.284,81.589
REFL_: C22.1 IC2.9 | length 1.9
  Bot w0.25: C22.1@51.355,82.589 IC2.9@53.284,82.589
RESIN: JB2.17 PB1.1 PB1.2 | length 32.3
  Top w0.125: PB1.1@79.435,85.218 79.435,84.868 78.735,84.168 78.735,77.168 79.435,76.468 79.435,75.768 82.161,73.043 85.506,73.043 86.082,73.619 v1(86.389,73.619) ; v1(97.475,69.329) JB2.17@97.475,70.404
  L3 w0.125: v1(86.389,73.619) 86.859,73.619 88.488,71.99 91.954,71.99 92.744,71.2 95.604,71.2 v1(97.475,69.329)
SD_CLK: IC6.9 JB1.28 | length 11.8
  Top w0.125: JB1.28@99.975,34.704 99.975,33.414 101.63,31.759 105.307,31.759 106.716,30.35 v1(106.716,28.802)
  Bot w0.125: v1(106.716,28.802) 106.716,28.701 106.864,28.552 106.864,27.893 IC6.9@106.848,27.877
SD_CMD: IC6.4 JB1.26 | length 13.2
  Top w0.125: JB1.26@99.475,34.704 99.475,33.514 101.59,31.399 104.676,31.399 105.581,30.494 105.581,28.906 104.851,28.176 104.419,28.176 104.283,28.312 v1(103.75,28.312)
  Bot w0.125: v1(103.75,28.312) 103.75,28.226 104.248,27.728 IC6.4@104.248,27.681
SD_DAT0: IC6.6 JB1.24 | length 10.3
  Top w0.125: JB1.24@98.975,34.704 98.975,33.285 101.28,30.981 101.608,30.981 102.155,30.433 104.265,30.433 v1(104.849,29.85)
  Bot w0.125: v1(104.849,29.85) 104.7,29.701 104.7,28.643 IC6.6@104.955,28.388
SD_DAT1: IC6.7 JB1.22 | length 12.4
  Top w0.125: JB1.22@98.475,34.704 98.475,33.205 101.435,30.245 101.435,30.232 101.45,30.247 v1(101.45,30.275)
  Bot w0.125: v1(101.45,30.275) 103.755,30.275 103.987,30.507 105.398,30.507 106.263,29.642 106.263,28.82 106.108,28.665 106.108,28.55 IC6.7@105.945,28.388
SD_DAT2: IC6.1 JB1.20 | length 10.2
  Top w0.125: JB1.20@97.975,34.704 97.975,32.809 101.308,29.476 v1(101.316,29.476)
  Bot w0.125: v1(101.316,29.476) 101.325,29.467 101.325,28.482 IC6.1@103.187,26.62
SD_DAT3: IC6.3 JB1.18 | length 11
  Top w0.125: JB1.18@97.475,34.704 97.475,32.217 101.954,27.738 103.145,27.738 103.154,27.746 103.284,27.746 v1(103.356,27.818)
  Bot w0.125: v1(103.356,27.818) 103.38,27.818 103.871,27.327 IC6.3@103.894,27.327
SENSE: IC2.50 R39.2 | length 3.4
  Bot w0.25: IC2.50@54.984,77.888 54.984,74.671 R39.2@55.105,74.55
SET: C148.1 IC19.7 R171.1 | length 6.6
  Top w0.3: IC19.7@47.632,57.542 47.629,57.539 47.636,57.532 v1(47.636,56.183)
  Bot w0.3: R171.1@44.52,53.753 46.498,53.753 46.737,53.992 47.407,53.992 47.636,54.221 v1(47.636,56.183)
SI5340_LOS_XAXBb: IC20.28 JB2.16 | length 50.3
  Top w0.125: JB2.16@96.975,66.704 96.987,66.691 v1(96.987,65.474)
  L4 w0.125: v1(90.3,57.984) 90.3,59.783 90.838,60.321 96.902,60.321 97.348,60.768 97.348,65.113 v1(96.987,65.474)
  Bot w0.125: IC20.28@60.95,45.125 62.467,45.125 65.342,48 72.484,48 82.805,58.321 86.294,58.321 86.66,57.955 90.271,57.955 v1(90.3,57.984)
SI5340_nINTR: IC20.33 JB2.22 | length 76.3
  Top w0.125: JB2.22@98.475,66.704 98.475,68.003 v1(98.975,68.503)
  L3 w0.125: v1(90.025,49.886) 90.097,49.957 90.41,49.957 90.535,50.082 100.209,50.082 101.431,51.305 101.431,54.657 100.689,55.4 100.258,55.4 100.026,55.632 93.726,55.632 v1(93.694,55.6)
  L4 w0.125: v1(93.694,55.6) 96.008,55.6 99.713,59.305 99.713,63.555 99.687,63.58 99.687,67.831 99.015,68.503 v1(98.975,68.503)
  Bot w0.125: v1(60.95,41.95) 61.775,41.125 63.263,41.125 65.157,43.019 74.075,43.019 79.692,48.636 86.475,48.636 88.775,48.636 v1(90.025,49.886)
  Bot w0.2: v1(60.95,41.95) IC20.33@60.95,42.625
Si5340_nLOL: IC20.27 JB2.18 | length 51.2
  Top w0.125: JB2.18@97.475,66.704 97.475,65.689 v1(97.69,65.473)
  L4 w0.125: v1(91.258,57.805) 93.212,59.758 97.19,59.758 97.69,60.258 v1(97.69,65.473) v1@97.69,65.669
  Bot w0.125: IC20.27@60.95,45.625 62.26,45.625 64.967,48.333 68.679,48.333 68.847,48.5 72.277,48.5 83.019,59.242 84.338,59.242 84.918,58.662 86.652,58.662 87.278,59.288 88.04,59.288 88.799,58.53 90.533,58.53 v1(91.258,57.805)
SI5340_nRST: IC20.17 JB2.25 | length 72.4
  Top w0.125: JB2.25@99.475,70.404 v1(99.475,71.672)
  L3 w0.125: v1(57,49.696) 57,51.696 59.36,54.055 60.195,54.055 62.183,56.043 62.183,58.634 63.602,60.054 65.039,60.054 65.321,59.772 71.747,59.772 73.029,61.055 79.681,61.055 81.393,59.343 84.839,59.343 85.033,59.538 85.481,59.538 85.914,59.105 85.914,58.479 86.588,57.806 88.021,57.806 89.022,56.805 v1(100.2,56.805)
  L4 w0.125: v1(99.475,71.672) 99.499,71.649 99.499,71.076 101.2,69.375 101.2,68.222 101.923,67.499 101.923,63.153 102.062,63.013 102.062,58.667 v1(100.2,56.805)
  Bot w0.125: v1(57,49.696) 57.5,49.196 IC20.17@57.5,48.575
SI5340_SCL: IC20.14 JB2.13 R173.2 TP21.1 | length 87
  Top w0.125: TP21.1@52.272,51.475 53.122,50.625 v1(53.675,50.625) ; v1(96.475,69.026) JB2.13@96.475,70.404
  L3 w0.125: v1(53.675,50.625) 54.184,50.625 56.607,53.048 56.607,55.249 59.312,57.953 59.826,57.953 60.574,58.701 60.574,59.54 65.321,64.287 70.871,64.287 72.629,62.53 80.327,62.53 82.739,60.117 86.469,60.117 87.204,59.382 87.204,58.632 87.468,58.367 88.894,58.367 89.894,57.367 91.467,57.367 92.217,58.117 v1(100.388,58.117)
  L4 w0.125: v1(96.475,69.026) 97.774,70.325 98.443,70.325 100.837,67.93 100.837,58.567 v1(100.388,58.117)
  Bot w0.125: v1(53.675,50.625) 55.11,50.625 56,49.735 IC20.14@56,48.575 ; R173.2@93.978,72.836 93.958,72.836 93.137,72.015 93.137,71.044 94.387,69.794 95.707,69.794 v1(96.475,69.026)
SI5340_SDA: IC20.13 JB2.15 R174.2 TP20.1 | length 87.9
  Top w0.125: TP20.1@49.988,51.475 49.994,51.469 49.994,50.126 v1(50.001,50.12) ; JB2.15@96.975,70.404 96.975,69.155 v1(97.65,68.48)
  L3 w0.125: v1(50.001,50.12) 54.433,50.12 57.155,52.842 57.155,54.976 59.58,57.4 60.34,57.4 64.687,61.747 79.997,61.747 81.957,59.788 85.585,59.788 87.316,58.056 88.488,58.056 89.427,57.117 91.65,57.117 92.117,57.584 99.338,57.584 v1(99.409,57.513)
  L4 w0.125: v1(97.65,68.48) 98.11,68.941 99.156,68.941 100.418,67.679 100.418,66.017 99.937,65.537 99.937,64.988 100.388,64.537 100.388,59.048 99.409,58.07 v1(99.409,57.513)
  Bot w0.125: v1(50.001,50.12) 54.879,50.12 55.5,49.499 IC20.13@55.5,48.575 ; R174.2@95,72.836 95,72.343 95.31,72.033 95.31,70.967 97.037,69.24 97.037,68.779 97.336,68.48 v1(97.65,68.48)
SoC_I2C_SCL: R3.1 R222.2 T14.2 | length 5.2
  Bot w0.125: R222.2@128.377,30.721 R3.1@128.377,31.681
  Bot w0.152: R3.1@128.377,31.681 128.472,31.587 130.079,31.587 130.473,31.981 T14.2@132.385,31.981
SoC_I2C_SDA: R2.1 R221.2 T13.2 | length 5.8
  Bot w0.125: R221.2@128.377,29.85 R2.1@128.377,28.82 128.834,28.82 129.17,29.156 131.959,29.156 132.385,28.73 T13.2@132.385,28.243
SPI1_MISO: J4.21 JB1.57 | length 50.3
  Top w0.125: v1(95.887,44.996) 99.629,44.996 99.973,44.651 99.973,43.996 103.124,40.845 106.53,40.845 107.475,39.9 JB1.57@107.475,38.404
  L3 w0.125: J4.21@68.27,34.08 72.704,34.08 76.741,38.118 v1@76.741,41.5
  Bot w0.125: v1(76.725,41.5) 76.761,41.536 81.56,41.536 81.704,41.392 86.366,41.392 87.062,42.088 87.062,42.401 88.241,43.58 88.821,43.58 90.237,44.996 91.706,44.996 91.985,45.275 94.467,45.275 94.75,44.992 95.883,44.992 v1(95.887,44.996)
SPI1_MOSI: J4.20 JB1.55 | length 52.2
  Top w0.125: v1(94.081,44.746) 94.358,44.469 99.333,44.469 99.723,44.079 99.723,43.892 103.02,40.595 103.207,40.595 103.409,40.393 106.061,40.393 106.975,39.479 JB1.55@106.975,38.404
  L3 w0.125: J4.20@65.73,31.54 66.874,31.54 67.861,32.528 68.747,32.528 69.264,32.01 72.262,32.01 78.915,38.663 v1@78.915,41.099
  Bot w0.125: v1(78.925,41.099) 85.005,41.099 85.1,41.004 86.332,41.004 87.312,41.984 87.312,42.297 87.84,42.825 88.42,42.825 90.341,44.746 v1(94.081,44.746)
SPI1_NSS: J4.23 JB1.59 | length 50
  Top w0.125: v1(95.132,45.955) 99.525,45.955 100.478,45.001 100.478,43.996 103.164,41.31 106.914,41.31 107.975,40.249 JB1.59@107.975,38.404
  L3 w0.125: J4.23@68.27,36.62 69.2,37.55 73.75,37.55 74.94,38.74 v1(74.94,41.598)
  Bot w0.125: v1(74.94,41.598) 78.334,44.992 79.709,44.992 79.963,45.246 91.029,45.246 91.738,45.955 v1(95.132,45.955)
SPI1_SCK: J4.24 JB1.61 | length 52.7
  Top w0.125: v1(96.048,46.619) 99.736,46.619 100.96,45.394 100.96,44.052 103.199,41.814 107.111,41.814 108.475,40.45 JB1.61@108.475,38.404
  L3 w0.125: J4.24@65.73,36.62 66.903,37.793 68.837,37.793 68.96,37.916 70.738,37.916 73.982,41.16 74.38,41.16 v1(74.419,41.199)
  Bot w0.125: v1(74.419,41.199) 74.396,41.223 74.396,41.95 77.733,45.287 79.412,45.287 79.902,45.777 90.311,45.777 91.153,46.619 v1(96.048,46.619)
TERM0: LD3.1 R101.1 | length 9.8
  Top w0.25: LD3.1@2.5,79.5 4.639,81.639 8.188,81.639 10.448,83.899 R101.1@10.498,83.899
TERM1: LD3.3 R103.1 | length 8
  Top w0.25: LD3.3@7.58,79.5 7.736,79.5 10.252,82.015 12.346,82.015 13.091,82.76 R103.1@13.091,83.855
TERM_STAT0: JB2.77 R100.2 SW2A.2 T1.1 | length 155.6
  Top w0.125: T1.1@11.438,89.731 11.438,88.863 11.87,88.431 15.356,88.431 15.775,88.012 15.775,86.745 13.95,84.92 13.95,82.42 11.625,80.095 11.625,76.244 13.038,74.831 SW2A.2@14.086,74.831 ; JB2.77@112.475,70.404 112.508,70.437 112.508,72.557 v1(112.571,72.62)
  Top w0.127: T1.1@11.438,89.731 v1@11.438,91
  L3 w0.125: v1(112.395,81.595) 112.975,81.015 112.975,73.024 v1(112.571,72.62)
  L4 w0.125: v1(11.477,90.972) 11.477,96.567 13.91,99 86.4,99 94.658,90.742 109.017,90.742 111.8,87.959 111.8,82.19 v1(112.395,81.595)
  Bot w0.125: v1(112.571,72.62) 112.571,72.081 112.383,71.893 112.383,71.117 112.7,70.8 112.7,70.362 R100.2@112.693,70.355
TERM_STAT1: JB2.75 R102.2 SW2B.2 T2.1 | length 156.5
  Top w0.125: T2.1@15.725,89.731 15.725,88.691 16.25,88.166 16.25,86.5 14.325,84.575 14.325,78.726 14.837,78.214 16.506,78.214 17.686,79.394 19,79.394 19.25,79.144 19.25,76.57 20.88,74.94 SW2B.2@22.411,74.94 ; JB2.75@111.975,70.404 111.987,70.416 111.987,72.187 v1(112,72.2)
  Top w0.127: T2.1@15.725,89.762 15.775,89.812 15.775,90.9 15.865,90.99 15.876,90.99 16.087,91.201 v1(16.188,91.201)
  L3 w0.125: v1(111.8,81) 111.974,81 112.499,80.475 112.499,73.167 112,72.668 v1(112,72.2)
  L4 w0.125: v1(16.188,91.201) 16.138,91.251 15.75,91.251 12.7,94.301 12.7,96.6 14.7,98.6 85.61,98.6 94.31,89.9 108.444,89.9 110.958,87.386 110.958,81.842 v1(111.8,81)
  Bot w0.125: R102.2@111.8,70.355 111.8,72 v1(112,72.2)
UART4_TX: J4.18 JB1.72 R193.2 | length 62
  Top w0.125: JB1.72@110.975,34.704 v1(110.975,35.779)
  L3 w0.125: J4.18@65.73,29 67.03,27.7 69.275,27.7 71.7,30.125 v1(71.7,30.175) ; v1(86.948,31.01) 89.157,33.22 89.157,36.433 91.205,38.481 91.205,41.078 94.042,43.914 104.061,43.914 108.5,39.475 108.5,38.254 v1(110.975,35.779)
  Bot w0.125: v1(71.7,30.175) 86.112,30.175 v1(86.948,31.01) ; R193.2@110.1,35.68 110.199,35.779 110.871,35.779 v1@110.925,35.725
UART_RX: JB1.96 W1.2 | length 62.2
  Top w0.125: JB1.96@116.975,34.704 v1(116.975,35.779)
  Bot w0.125: W1.2@90.75,81.88 89.604,80.734 89.604,76.34 90.974,74.971 90.974,69.692 89.549,68.267 89.549,66.445 92.619,63.375 94.951,63.375 98.85,59.475 98.85,57.454 102.442,53.862 102.442,52.897 103.688,51.65 103.806,51.65 104.57,50.886 105.604,50.886 116,40.489 116,36.754 v1(116.975,35.779)
UART_TX: JB1.94 W1.3 | length 61.9
  Top w0.125: v1(116.475,33.629) JB1.94@116.475,34.704
  Bot w0.125: W1.3@90.75,79.34 90.938,79.34 91.895,78.383 91.895,70.664 91.312,70.081 91.312,68.691 92.225,67.779 92.225,66.743 91.735,66.253 91.735,64.836 92.802,63.769 95.881,63.769 99.825,59.825 99.825,57.836 100.037,57.624 100.294,57.367 ; 100.294,57.367 101.652,56.009 101.652,55.576 103.1,54.128 103.1,52.709 104.309,51.5 105.676,51.5 116.475,40.701 116.475,37.75 117.543,36.682 117.543,35.472 116.475,34.404 v1(116.475,33.629)
USB-VBUS: JB3.56 R1.1 | length 116
  Top w0.125: JB3.56@86.575,58.805 v1(87.65,58.805)
  L3 w0.125: v1(86.313,60.85) 87.65,59.513 v1(87.65,58.805)
  L4 w0.125: v1@86.313,60.835 86.328,60.85 v1(86.313,60.85)
  Bot w0.2: R1.1@14.877,29.151 14.35,29.151 14.23,29.271 14.23,32 14.701,32.47 14.704,32.47 15.755,33.521 15.755,33.525 16.805,34.575 22.95,34.575 25.665,37.29 25.665,44.64 31.45,50.425 32.531,50.425 34.178,52.072 34.178,55.925 35.67,57.416 38.777,57.416 39.264,57.903 39.264,63.369 38.905,63.729 38.905,66.077 40.623,67.796 43.048,67.796 44.97,65.874 44.97,62.959 46.104,61.825 46.531,61.825 46.608,61.748 47.557,61.748 47.703,61.895 58.643,61.895 58.782,62.035 69.722,62.035 70.659,61.098 70.659,59.101 71.336,58.423 72.38,58.423 73.558,57.246 76.169,57.246 81.124,62.201 84.299,62.201 85.175,61.325 85.297,61.325 85.772,60.85 v1(86.313,60.85)
USB-VBUS_R: C2.2 D17.5 IC1.6 IC1.7 IC1.8 J1.1 R1.2 | length 22
  L3 w0.3: v1(3.2,20.8) 4.7,20.8 5.599,19.901 v1(7.58,19.901) 11.032,23.353 11.032,24.282 14.329,27.579 v1(14.9,27.579)
  Bot w0.3: J1.1@3.2,20.195 v1(3.2,20.8) ; D17.5@7.551,19.327 7.551,19.872 v1(7.58,19.901) ; v1(14.9,27.579) 14.889,27.59 14.889,28.2 R1.2@14.877,28.211 14.9,28.234 16.221,28.234 IC1.6@16.243,28.256 IC1.7@16.243,28.906 IC1.8@16.243,29.556 16.243,31.021 C2.2@16.093,31.171
USB_OC: IC1.5
VBUS_V_EN: IC1.4 JB3.54 | length 103.4
  Top w0.125: v1(85.1,60.85) 84.725,60.474 84.725,58.747 85.167,58.305 JB3.54@86.575,58.305
  L3 w0.125: v1(82.069,61.406) 82.922,62.259 84.224,62.259 85.1,61.383 v1(85.1,60.85)
  Bot w0.125: IC1.4@20.643,27.606 21.143,27.606 21.499,27.25 26.36,27.25 26.447,27.162 28.212,27.162 29.27,28.22 29.27,46.048 32.886,49.664 34.664,49.664 37.431,52.431 42.183,52.431 43.468,53.716 43.765,54.144 ccw(c43.323,54.45) 43.833,54.28 43.943,54.452 44.016,54.526 44.041,54.526 44.362,54.847 44.362,55.392 44.645,55.675 44.645,56.55 45.28,57.185 45.28,60.21 46.531,61.461 57.88,61.461 58.027,61.608 63.701,61.608 63.841,61.747 69.515,61.747 69.875,61.388 69.875,58.333 71.466,56.741 76.824,56.741 81.489,61.406 v1(82.069,61.406)
VCM1: C26.2 C46B.2 IC2.1 IC27B.2 | length 14.5
  Top w0.25: v1(42.983,76.239) 42.983,76.307 43.075,76.399 43.075,77.449 IC27B.2@43.113,77.487 ; v1(52.533,78.156) 52.581,78.203 53.187,78.203 C26.2@53.334,78.35
  L3 w0.25: v1(42.983,76.239) 43.634,76.89 51.267,76.89 v1(52.533,78.156)
  Bot w0.25: C46B.2@42.789,77.201 42.789,76.5 42.983,76.307 v1(42.983,76.239) ; v1(52.533,78.156) 52.966,78.589 IC2.1@53.284,78.589 IC2.1@53.274,78.598
VCM2: C27.2 C46A.2 IC2.14 IC27A.2 | length 11.6
  Top w0.25: IC27A.2@45.974,87.962 46.012,87.924 46.012,86.713 v1(46.049,86.675) ; C27.2@52.286,85.81 52.293,85.817 52.293,86.493 v1(52.3,86.5)
  L3 w0.25: v1(46.049,86.675) 46.049,86.652 46.576,86.125 51.857,86.125 52.232,86.5 v1(52.3,86.5)
  Bot w0.25: C46A.2@46.04,87.75 46.045,87.746 46.045,86.679 v1(46.049,86.675) ; v1(52.3,86.5) 53.284,85.516 IC2.14@53.284,85.089
VOUTA: IC34.3 R35.1 | length 89.6
  Top w0.125: R35.1@74.377,87.115 76.3,87.115 77.543,88.358 v1(77.543,89.285) ; IC34.3@109.512,59.917 IC34.3@109.5,59.905 109.5,61.096 109.68,61.277 v1(109.68,61.378)
  L3 w0.125: v1(109.68,61.378) 109.715,61.413 109.715,61.815 111.175,63.275 121.75,63.275 122.95,64.475 122.95,71.372 125.95,74.372 v1(125.95,77.725)
  L4 w0.125: v1(77.543,89.285) 88.9,89.285 91.05,87.135 96.003,87.135 105.737,77.401 110.201,77.401 111.375,78.575 125.1,78.575 v1(125.95,77.725)
VOUTB: IC34.23 R37.1 | length 120
  Top w0.125: R37.1@74.409,91.65 76.494,91.65 v1@76.859,91.285 ; v1(109.875,52.404) 109.869,52.41 109.869,52.905 110.131,53.167 110.131,54.186 IC34.23@110.15,54.205
  L3 w0.125: v1(63.914,95.801) 65.427,97.314 98.849,97.314 99.267,96.896 109.665,96.896 112.199,94.362 112.199,92.681 114.051,90.828 114.202,90.828 116.438,88.592 116.438,76.463 115.25,75.276 115.25,71.539 114,70.289 114,69.694 113.95,69.645 113.95,67.699 109.2,62.948 109.2,58.998 109.875,58.324 v1(109.875,52.404)
  Bot w0.125: v1(63.914,95.801) 63.914,91.659 65.673,89.9 73.3,89.9 74.55,91.15 v1(76.8,91.15)
XTAL_GND: IC20.4 IC20.7 Q1.2 Q1.4 | length 4.1
  Bot w0.125: IC20.7@54.125,45.65 IC20.7@54.15,45.625
  Bot w0.3: Q1.2@52.025,45.625 52.268,45.868 Q1.2@52.268,46.214 ; 52.268,46.225 53,46.225 53.6,45.625 IC20.7@54.05,45.625 ; 53,43.5 53,43.534 53.591,44.125 IC20.4@54.05,44.125
  other v1: 50.105,42.95 50.735,42.95 51.365,42.95 51.995,42.95 52.625,42.95 48.725,43.48 48.725,44.045 48.725,44.61 48.725,45.175 48.725,45.74 48.725,46.305 49.55,46.775 50.256,46.775 50.963,46.775 51.669,46.775 52.375,46.775
pads on no net: D17.3 D21.1 D21.3 D22.1 D22.6 FTG1.FTG2 FTG2.1 FTG3.1 FTG4.1 IC5.1 IC6.8 IC6.10 IC6.12 IC6.13 IC6.14 IC6.15 IC7.5 IC9.4 IC10.4 IC10.5 IC10.6 IC10.16 IC11.5 IC11.10 IC12.4 IC12.5 IC12.6 IC12.9 IC15.3 IC15.6 IC16.4 IC18.4 IC19.4 IC20.1 IC20.2 IC20.3 IC20.10 IC20.11 IC20.12 IC20.22 IC20.35 IC20.37 IC20.38 IC20.41 IC20.42 IC21.4 IC22.8 IC22.9 IC26.1 IC26.6 IC28A.3 IC28A.11 IC28B.3 IC28B.11 IC30.1 IC32.1 IC32.5 IC32.6 IC34.2 IC34.4 IC34.6 IC34.12 IC34.13 IC34.22 J7.21 J7.22 J9.2 J10.9 J16.14 J17.12 J17.14 J17.15 J17.16 JB1.13 JB1.80 JB1.86 JB1.88 JB1.91 JB1.92 JB1.H1 JB1.H2 JB2.20 JB2.30 JB2.71 JB2.73 JB2.90 JB2.99 JB2.H1 JB2.H2 JB3.1 JB3.2 JB3.3 JB3.4 JB3.7 JB3.8 JB3.9 JB3.10 JB3.13 JB3.14 JB3.15 JB3.16 JB3.19 JB3.20 JB3.21 JB3.22 JB3.25 JB3.26 JB3.27 JB3.28 JB3.31 JB3.32 JB3.33 JB3.34 JB3.H1 JB3.H2
copper on no net: | length 2.1
  Top w0.25: 12.725,61.625 12.896,61.625 12.905,61.635 12.905,62.73 13.025,62.85 v1(13.67,62.85)

## Polygon pours and split planes (outlines as drawn)
no net on Top "NONET_L-01_P-001" (solid, pour order 610): 0.279,97.104 159.69,97.104 159.69,3.819 158.461,2.591 1.854,2.591 0.356,4.089 0.356,13.665 1.119,14.429 2.021,14.429 2.285,14.693 2.285,22.88 1.719,23.445 0.12,23.445 -1.99,25.555 -1.99,88.84 0.279,91.11